# Altium PCB JIG_TEST_FLEX_V1.0.PcbDoc (part 1 of 2)
Units mm, origin at the board's own origin, x right, y up, seen from the top; angles counter-clockwise.
Board outline 55 x 70 mm, 2 copper layers (Top Layer, Bottom Layer); 135 components, 71 nets, 349 pads, 291 vias.
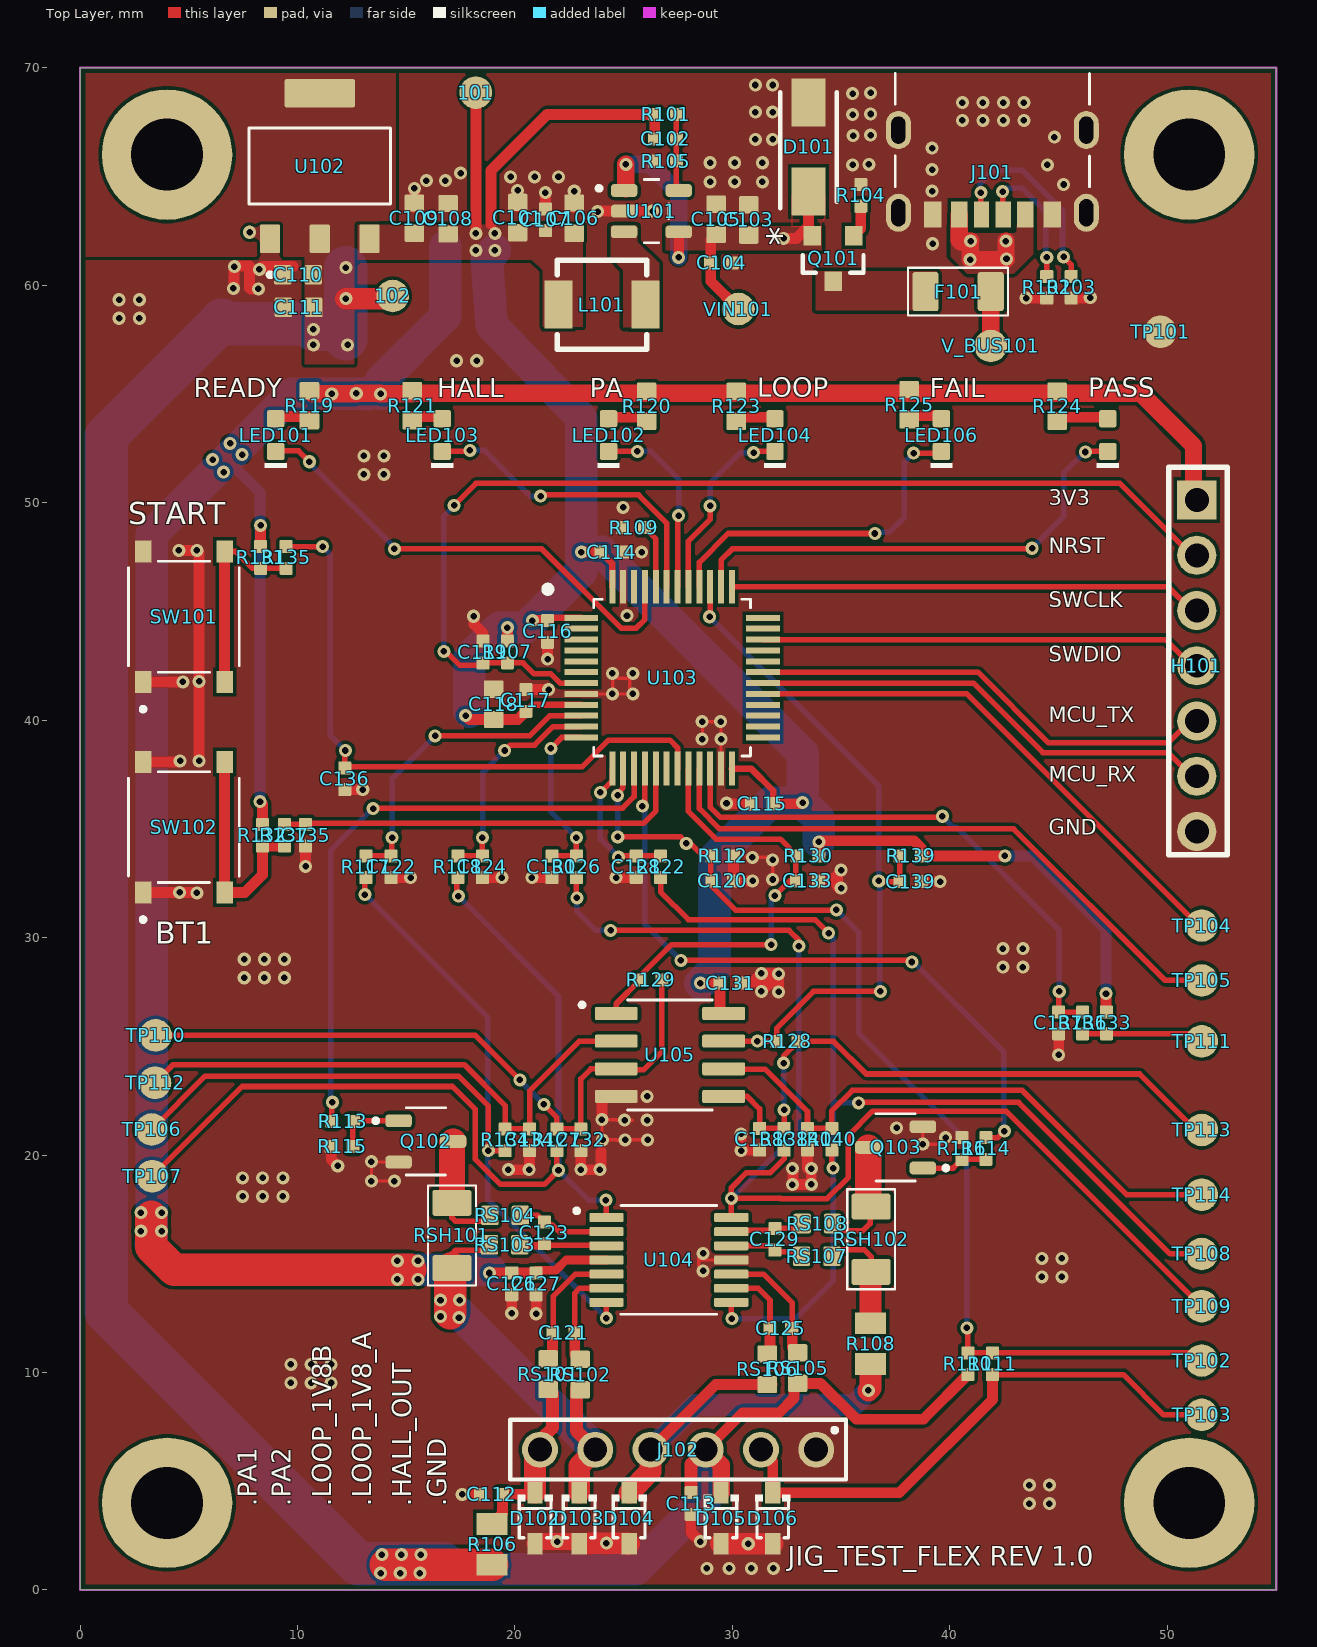
[diagram p0: Top Layer view]
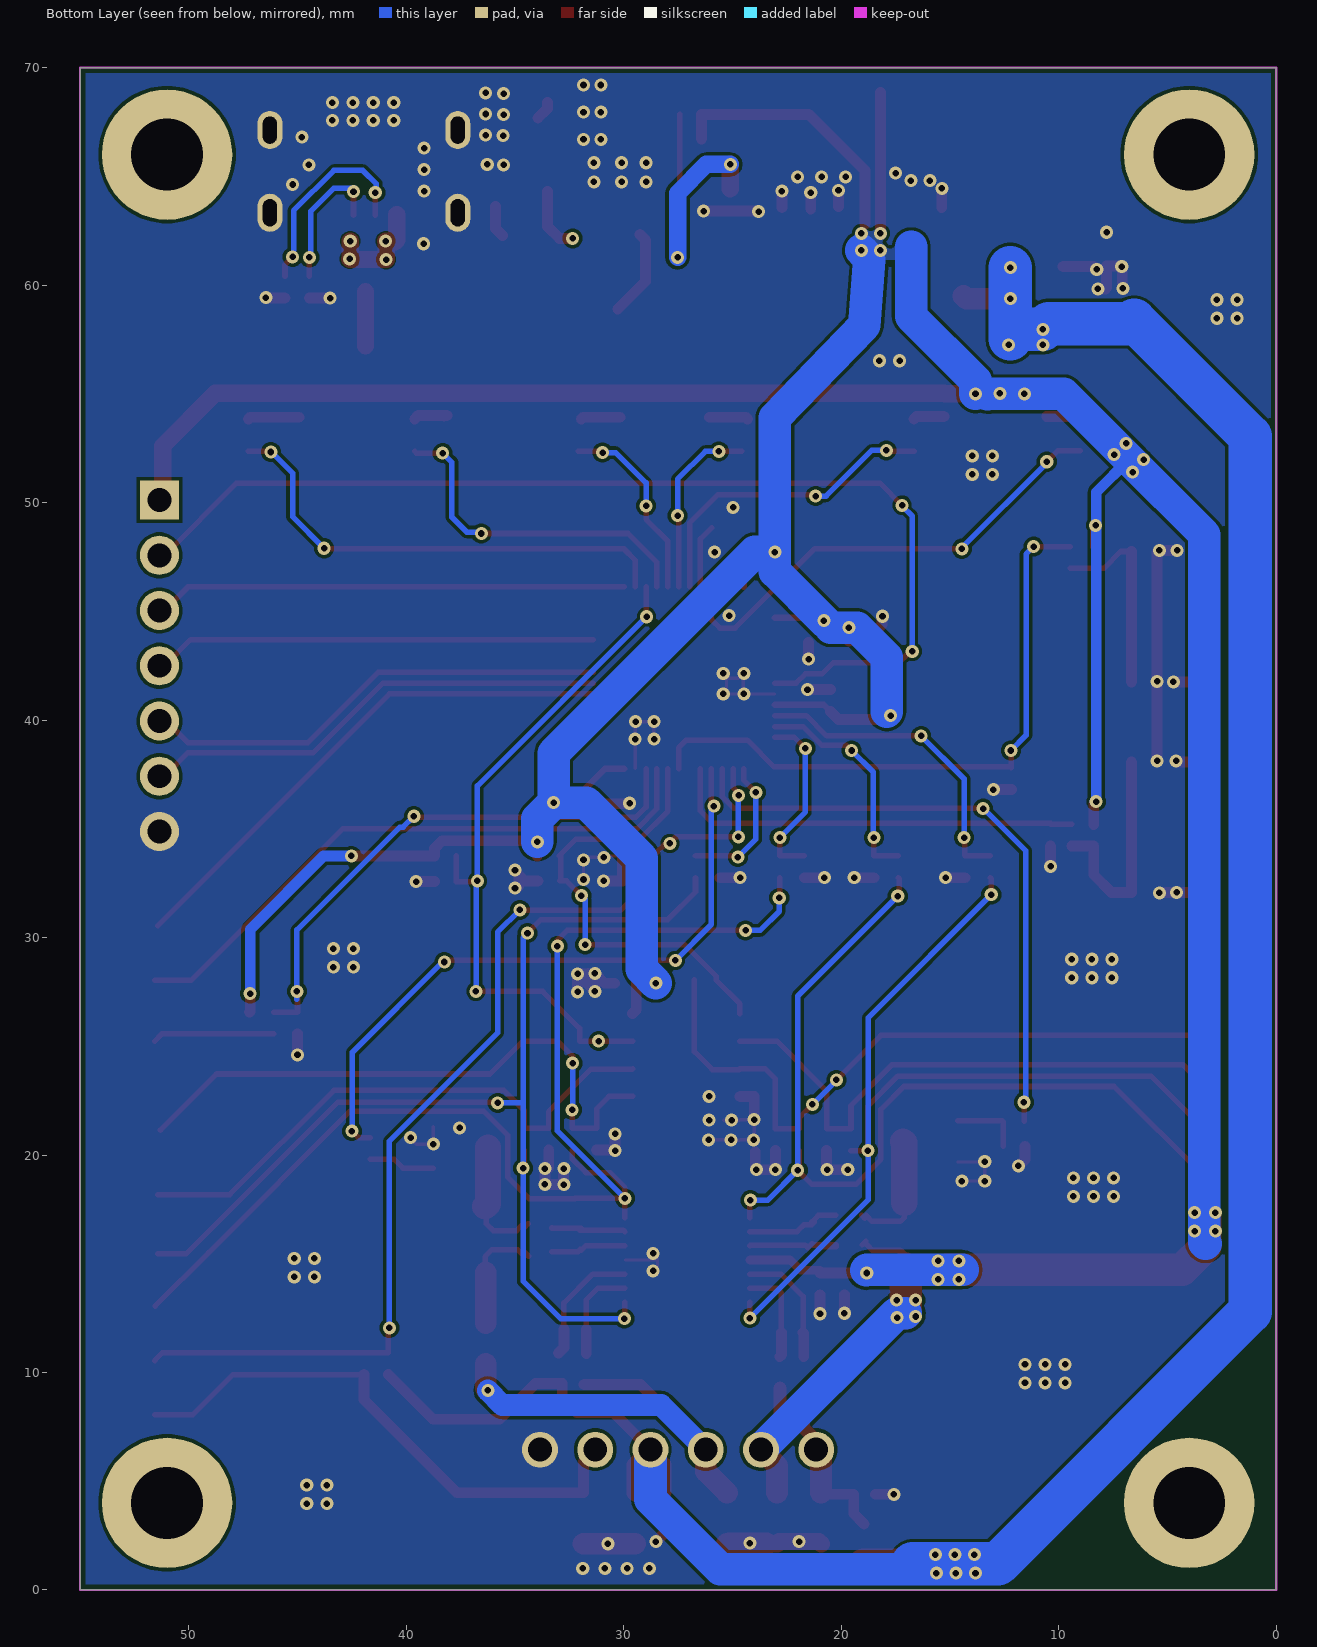
[diagram p1: Bottom Layer view, seen from below]
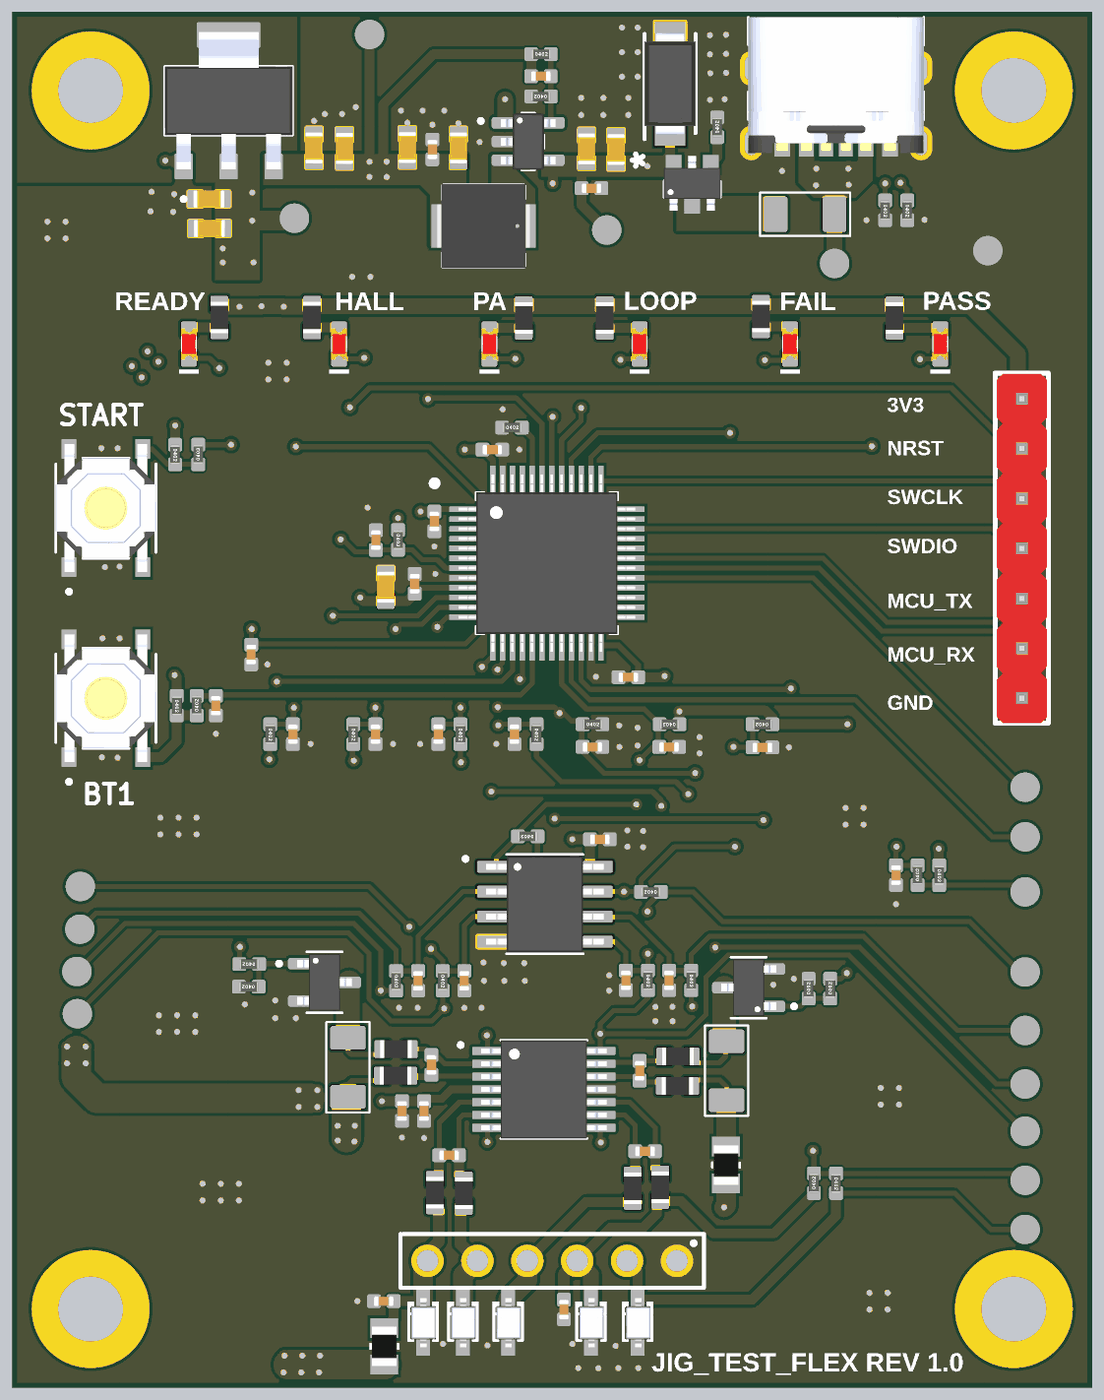
[diagram p3: 3D render of the assembled board from above, using the file's embedded part models]

## Layer stack, top to bottom
Top Solder: solder mask 0.0102, Solder Resist, Dk 3.5
Top Layer: signal copper 0.0356
Dielectric 1: dielectric 0.32, FR-4, Dk 4.8
Bottom Layer: signal copper 0.0356
Bottom Solder: solder mask 0.0102, Solder Resist, Dk 3.5

## Board outline
0,0 0,70 55,70 55,0

## Design rules (kind name [scope] priority, off if disabled: settings)
AssemblyTestPointUsage [All] p1: isadvanced=TRUE
AssemblyTestpoint [All] p1: isadvanced=TRUE testpointundercomponent=TRUE minsize=1.016 maxsize=2.54 preferedsize=1.524 minholesize=0 maxholesize=1.016 preferedholesize=0.813 testpointgrid=0.025 usegrid=TRUE gridoriginx=2.775 gridoriginy=0.075 gridtolerance=0 allowsidetop=TRUE allowsidebottom=TRUE
BoardOutlineClearance [All] p1: isadvanced=TRUE gap=0.2 ignorepadtopadclearanceinfootprint=FALSE
Clearance Clearance_1 [OnMid vs OnMid] p1: gap=0.15 ignorepadtopadclearanceinfootprint=FALSE sourcerule=42 cellrowname=All cellrowtype=0 cellcolname=All cellcoltype=0 innerlayers=TRUE
Clearance Clearance_2 [(ExistsOnLayer('Top Layer') Or ExistsOnLayer('Bottom Layer')) vs (ExistsOnLayer('Top Layer') Or ExistsOnLayer('Bottom Layer'))] p2: gap=0.15 ignorepadtopadclearanceinfootprint=FALSE sourcerule=42 cellrowname=All cellrowtype=0 cellcolname=All cellcoltype=0 outerlayers=TRUE
Clearance [All] p3: gap=0.2 ignorepadtopadclearanceinfootprint=FALSE except(0: Arc-Arc Arc-Track Arc-SMDPad Arc-THPad Arc-Via Arc-Text Arc-Hole Track-Track Track-SMDPad Track-THPad Track-Via Track-Text Track-Hole SMDPad-Via THPad-Via Via-Via) ismatrix=TRUE
ComponentClearance [All] p1: isadvanced=TRUE gap=0.254 collisioncheckmode=3 verticalgap=0.254 showdistances=FALSE
FabricationTestPointUsage [All] p1: isadvanced=TRUE valid=0 allowmultiple=FALSE
FabricationTestpoint [All] p1: isadvanced=TRUE side=3 testpointundercomponent=TRUE minsize=1.016 maxsize=2.54 preferedsize=1.524 minholesize=0 maxholesize=1.016 preferedholesize=0.813 testpointgrid=0.025 allowsidetop=TRUE allowsidebottom=TRUE usegrid=TRUE gridoriginx=2.775 gridoriginy=0.075 gridtolerance=0
FanoutControl Fanout_BGA [IsBGA] p1: isadvanced=TRUE bgadir=Out bgaviamode=Centered fanoutstyle=Auto fanoutdirection=Alternating viagrid=0.025 // Fanout_BGA (Default Rule)
FanoutControl Fanout_LCC [IsLCC] p2: isadvanced=TRUE bgadir=Out bgaviamode=Centered fanoutstyle=Auto fanoutdirection=Alternating viagrid=0.025 // Fanout_LCC (Default Rule)
FanoutControl Fanout_SOIC [IsSOIC] p3: isadvanced=TRUE bgadir=Out bgaviamode=Centered fanoutstyle=Auto fanoutdirection=Alternating viagrid=0.025 // Fanout_SOIC (Default Rule)
FanoutControl Fanout_Small [(CompPinCount < 5)] p4: isadvanced=TRUE bgadir=Out bgaviamode=Centered fanoutstyle=Auto fanoutdirection=OutThenIn viagrid=0.025 // Fanout_Small (Default Rule)
FanoutControl Fanout_Default [All] p5: isadvanced=TRUE bgadir=Out bgaviamode=Centered fanoutstyle=Auto fanoutdirection=Alternating viagrid=0.025 // Fanout_Default (Default Rule)
Height [All] p1: isadvanced=TRUE minheight=0 maxheight=25.4 prefheight=12.7
HoleSize [All] p1: isadvanced=TRUE absolutevalues=TRUE maxlimit=3.5 minlimit=0.025 maxpercent=80.000 minpercent=20.000
HoleToHoleClearance [All] p1: isadvanced=TRUE gap=0.254 allowstackedmicrovias=TRUE
LayerPairs [All] p1: isadvanced=TRUE enforce=TRUE
MinimumSolderMaskSliver [All] p1: isadvanced=TRUE minsoldermaskwidth=0.1
NetAntennae [All] p1: isadvanced=TRUE netantennaetolerance=0
PasteMaskExpansion [All] p1: isadvanced=TRUE expansion=0
PlaneClearance [All] p1: isadvanced=TRUE clearance=0.508
PlaneConnect [All] p1: isadvanced=TRUE planeconnectstyle=Direct reliefexpansion=0.508 reliefentries=4 reliefconductorwidth=0.254 reliefairgap=0.254
PolygonConnect [All] p1: connectstyle=Direct reliefconductorwidth=0.254 reliefentries=4 polygonreliefangle="90 Angle" airgapwidth=0.254
RoutingCorners [All] p1: isadvanced=TRUE cornerstyle=45-Degree minsetback=2.54 maxsetback=2.54
RoutingPriority [All] p1: isadvanced=TRUE routingpriority=0
RoutingVias [All] p1: holewidth=0.3 width=0.6 viastyle="Through Hole" minholewidth=0 minwidth=0 maxholewidth=0.711 maxwidth=1
ShortCircuit [All] p1: isadvanced=TRUE allowed=FALSE
SilkToSilkClearance [All] p1: isadvanced=TRUE silktosilkclearance=0.15
SilkToSolderMaskClearance [IsPad] p1: isadvanced=TRUE minsilkscreentomaskgap=0.15 clearancetoexposedcopper=TRUE
SolderMaskExpansion [All] p1: isadvanced=TRUE expansion=0 istentingtop=FALSE
SupplyNets "Schematic Supply Nets_4" [InNet('3V3')] p1: isadvanced=TRUE voltage=0.000
SupplyNets "Schematic Supply Nets_3" [InNet('V_BUS')] p2: isadvanced=TRUE voltage=0.000
SupplyNets "Schematic Supply Nets_2" [InNet('V_IN')] p3: isadvanced=TRUE voltage=0.000
SupplyNets "Schematic Supply Nets_1" [InNet('LOOP_1V8_A')] p4: isadvanced=TRUE voltage=0.000
SupplyNets "Schematic Supply Nets" [InNet('GND')] p5: isadvanced=TRUE voltage=0.000
UnRoutedNet [All] p1: isadvanced=TRUE
UnpouredPolygon [All] p1: isadvanced=TRUE
Width [All] p1: maxlimit=2 minlimit=0.15 preferedwidth=0.254
4 further rules are at their usual default settings.

## Components (designator, comment, footprint, x,y, rotation, side; value= is the part's Value field where it differs from the comment)
101 "TP_?" TP_SMD_1P50 18.2,68.85 r270 top
102 "TP_?" TP_SMD_1P50 14.375,59.5 r90 top
C101 "10uF" C0603L 20.125,63.1 r90 top
C102 "DNP" C0402L 26.925,66.725 r0 top
C103 "10uF" C0603L 30.75,63 r90 top
C104 "100nF" C0402L 29.5,61.025 r0 top
C105 "4.7uF" C0603L 29.25,63.025 r90 top
C106 "22uF" C0603L 22.725,63.075 r90 top
C107 "100nF" C0402L 21.4,63 r90 top
C108 "10uF" C0603L 16.925,63.05 r90 top
C109 "4.7uF" C0603L 15.375,63.075 r90 top
C110 "4.7uF" C0603L 10.025,60.475 r180 top
C111 "10uF" C0603L 10.05,58.975 r180 top
C112 "100nF" C0402L 18.925,4.4 r180 top
C113 "100nF" C0402L 28.1,3.975 r270 top
C114 "100nF" C0402L 24.45,47.725 r0 top
C115 "100nF" C0402L 31.375,36.15 r180 top
C116 "100nF" C0402L 21.5,44.075 r270 top
C117 "100nF" C0402L 20.5,40.9 r90 top
C118 "4.7uF" C0603L 19.025,40.725 r90 top
C119 "100nF" C0402L 18.525,43.125 r90 top
C120 "1nF" C0402L 29.55,32.6 r0 top
C121 "1nF" C0402L 22.25,11.825 r0 top
C122 "6.8nF" C0402L 14.3,33.25 r270 top
C123 "1nF" C0402L 21.35,16.425 r90 top
C124 "6.8nF" C0402L 18.5,33.25 r270 top
C125 "1nF" C0402L 32.225,12.025 r180 top
C126 "1uF" C0402L 19.85,14.075 r270 top
C127 "100nF" C0402L 20.975,14.075 r270 top
C128 "6.8nF" C0402L 25.575,33.25 r270 top
C129 "1nF" C0402L 31.95,16.125 r90 top
C130 "6.8nF" C0402L 21.7,33.25 r270 top
C131 "100nF" C0402L 29.925,27.9 r0 top
C132 "6.8nF" C0402L 23.025,20.7 r270 top
C133 "1nF" C0402L 33.45,32.6 r0 top
C134 "6.8nF" C0402L 20.675,20.7 r270 top
C135 "100nF" C0402L 10.375,34.7 r270 top
C136 "100nF" C0402L 12.175,37.3 r270 top
C137 "100nF" C0402L 45,26.075 r270 top
C138 "6.8nF" C0402L 31.25,20.725 r270 top
C139 "1nF" C0402L 38.2,32.575 r0 top
C140 "6.8nF" C0402L 33.45,20.725 r270 top
D101 "SMAJ5.0A" DIOM5026X229N 33.5,66.35 r90 top
D102 "PESD5V0U1UA" SOD-323_L1.8-W1.3-LS2.5-RD 20.925,3.3 r270 top
D103 "PESD5V0U1UA" SOD-323_L1.8-W1.3-LS2.5-RD 22.95,3.3 r270 top
D104 "PESD5V0U1UA" SOD-323_L1.8-W1.3-LS2.5-RD 25.25,3.3 r270 top
D105 "PESD5V0U1UA" SOD-323_L1.8-W1.3-LS2.5-RD 29.475,3.3 r270 top
D106 "PESD5V0U1UA" SOD-323_L1.8-W1.3-LS2.5-RD 31.85,3.3 r270 top
F101 "PTC 500mA 6V" R1206Z 40.375,59.7 r180 top
H101 "HEADER DEBUG" HDR_1X07_P2.54_D1.10 51.35,50.115 r270 top
J101 "10164359-00011LF" AMPHENOL_10164359-00011LF 41.95,66.275 r180 top
J102 "Header 6P" 61300611121 27.5,6.45 r180 top
L101 "2.2uH" IND-SMD_L4.1-W4.1_PSPMAA0402-1 24,59.1 r180 top
LED101 "READY" LED0603_RED 9,53.1 r270 top
LED102 "PA" LED0603_RED 24.303,53.1 r270 top
LED103 "HALL" LED0603_RED 16.652,53.1 r270 top
LED104 "LOOP" LED0603_RED 31.955,53.1 r270 top
LED106 "FAIL" LED0603_RED 39.607,53.1 r270 top
PASS "PASS" LED0603_RED 47.259,53.1 r270 top (schematic designator LED105)
Q101 "AO3401A" SOT23-3 34.625,61.275 r90 top
Q102 "AO3400A" SOT95P280X125-3N 15.905,20.625 r0 top
Q103 "AO3400A" SOT95P280X125-3N 37.5,20.35 r180 top
R101 "100K" R0402L1 26.925,67.85 r0 top
R102 "5.1K" R0402L1 44.45,59.9 r270 top
R103 "5.1K" R0402L1 45.575,59.9 r270 top
R104 "5.1K" R0402L1 35.9,64.125 r90 top
R105 "22K" R0402L1 26.925,65.7 r180 top
R106 "20R" R0805 18.95,2.1 r90 top
R107 "10K" R0402L1 19.65,43.132 r270 top
R108 "20R" R0805 36.35,11.325 r270 top
R109 "10K" R0402L1 25.45,48.85 r0 top
R110 "100K" R0402L1 40.825,10.4 r90 top
R111 "1K" R0402L1 41.95,10.4 r270 top
R112 "100K" R0402L1 29.55,33.75 r0 top
R113 "4.7K" R0402L1 12.075,21.55 r180 top
R114 "4.7K" R0402L1 41.65,20.3 r90 top
R115 "100K" R0402L1 12.05,20.4 r180 top
R116 "100K" R0402L1 40.55,20.3 r90 top
R117 "470R" R0402L1 13.146,33.25 r270 top
R118 "470R" R0402L1 17.375,33.25 r270 top
R119 "680R" R0603L 10.55,54.45 r270 top
R120 "680R" R0603L 26.05,54.425 r270 top
R121 "680R" R0603L 15.275,54.45 r270 top
R122 "470R" R0402L1 26.7,33.25 r270 top
R123 "680R" R0603L 30.175,54.425 r270 top
R124 "680R" R0603L 44.925,54.425 r270 top
R125 "680R" R0603L 38.125,54.5 r270 top
R126 "470R" R0402L1 22.825,33.25 r270 top
R127 "470R" R0402L1 21.925,20.7 r270 top
R128 "DNP" R0402L1 32.525,25.225 r180 top
R129 "DNP" R0402L1 26.25,28.05 r180 top
R130 "4.7K" R0402L1 33.475,33.75 r180 top
R131 "10K" R0402L1 8.3,47.475 r270 top
R132 "10K" R0402L1 8.388,34.7 r270 top
R133 "10K" R0402L1 47.2,26.075 r270 top
R134 "470R" R0402L1 19.55,20.7 r270 top
R135 "1K" R0402L1 9.475,47.475 r90 top
R136 "1K" R0402L1 46.1,26.075 r90 top
R137 "1K" R0402L1 9.4,34.7 r90 top
R138 "470R" R0402L1 32.375,20.725 r270 top
R139 "4.7K" R0402L1 38.2,33.75 r180 top
R140 "470R" R0402L1 34.575,20.725 r270 top
RS101 "4.7R" R0603L 21.525,9.925 r270 top
RS102 "4.7R" R0603L 23,9.9 r270 top
RS103 "4.7R" R0603L 19.525,15.875 r180 top
RS104 "4.7R" R0603L 19.546,17.221 r180 top
RS105 "4.7R" R0603L 33,10.2 r270 top
RS106 "4.7R" R0603L 31.6,10.15 r270 top
RS107 "4.7R" R0603L 33.875,15.35 r0 top
RS108 "4.7R" R0603L 33.9,16.85 r0 top
RSH101 "1R" R1206Z 17.1,16.3 r270 top
RSH102 "1R" R1206Z 36.375,16.125 r270 top
SW101 "TS-1187A-B-A-B" SW_TS-1187A-B-A-B 4.775,44.75 r90 top
SW102 "TS-1187A-B-A-B" SW_TS-1187A-B-A-B 4.775,35.075 r90 top
TP101 "TP_?" TP_SMD_1P50 49.675,57.85 r0 top
TP102 "" TP_SMD_1P50 51.575,10.55 r90 top
TP103 "" TP_SMD_1P50 51.575,8.05 r90 top
TP104 "TP_PA8" TP_SMD_1P50 51.575,30.55 r90 top
TP105 "TP_PA8" TP_SMD_1P50 51.575,28.025 r90 top
TP106 "" TP_SMD_1P50 3.3,21.175 r90 top
TP107 "" TP_SMD_1P50 3.325,19.025 r90 top
TP108 "" TP_SMD_1P50 51.575,15.45 r90 top
TP109 "" TP_SMD_1P50 51.575,13.05 r90 top
TP110 "" TP_SMD_1P50 3.475,25.5 r90 top
TP111 "TP_SW3" TP_SMD_1P50 51.575,25.225 r90 top
TP112 "" TP_SMD_1P50 3.45,23.325 r90 top
TP113 "" TP_SMD_1P50 51.575,21.15 r90 top
TP114 "" TP_SMD_1P50 51.575,18.175 r90 top
U101 "TLV62569DBVR" SOT95P280X145-5N 26.275,63.4 r0 top
U102 "AMS1117-1.8" SOT229P700X180-4N 11.025,65.475 r90 top
U103 "STM32F030C8T6" QFP50P900X900X160-48N 27.225,41.95 r0 top
U104 "INA4180A1IPWR" SOP65P640X120-14N 27.075,15.175 r0 top
U105 "LMV393IDR" SOIC127P599X175-8N 27.125,24.6 r0 top
V_BUS101 "TP_?" TP_SMD_1P50 41.875,57.2 r270 top
VIN101 "TP_?" TP_SMD_1P50 30.275,58.9 r180 top

## Footprints (in the part's own frame and the unit in brackets; to place one, negate y for a bottom-side part, rotate by r counter-clockwise, add the part's x,y. Pads: shape width x height; smd on the part's side, far side on the other; paste and mask are expansions set on the pad)
61300611121 [mm]
  round 1.65 hole 1.1: 1(-6.35,0) 2(-3.81,0) 3(-1.27,0) 4(1.27,0) 5(3.81,0) 6(6.35,0)
  silkscreen extent -7.72,-1.37 7.72,1.37
AMPHENOL_10164359-00011LF [mm]
  rect 0.7x1.2 smd: A5(-0.5,3.03) B5(0.5,3.03)
  rect 0.76x1.2 smd: A9(1.52,3.03) B9(-1.52,3.03)
  rect 0.8x1.2 smd: A12(2.75,3.03) B12(-2.75,3.03)
  oval 1.15x1.75 hole 0.65 slot 1.25 at 90 deg: SH1(-4.32,2.95) SH2(4.32,2.95) SH3(-4.32,-0.85) SH4(4.32,-0.85)
  silkscreen extent -4.47,-3.45 4.47,1.76, body extent -4.47,-3.45 4.47,3.45, height 3.26
C0402L [mm]
  rrect20% 0.6x0.6 smd paste+0.05 mask+0.05: 1(-0.5,0) 2(0.5,0)
  body extent -0.5,-0.25 0.5,0.25, height 0.49
C0603L [mm]
  rrect20% 0.8x0.9 smd mask+0.05: 1(-0.7,0) 2(0.7,0)
  body extent -0.8,-0.45 0.8,0.45, height 0.8
DIOM5026X229N [mm]
  rect 2.2x1.55 smd paste+0 mask+0.102: 1(-2.05,0) 2(2.05,0)
  silkscreen extent -2.83,-1.3 2.52,1.3, body extent -2.61,-1.3 2.61,1.3, height 2.4
HDR_1X07_P2.54_D1.10 [mm]
  rect 1.8x1.8 hole 1.1: 1(0,0)
  round 1.8 hole 1.1: 2(2.54,0) 3(5.08,0) 4(7.62,0) 5(10.16,0) 6(12.7,0) 7(15.24,0)
  silkscreen extent -1.5,-1.3 16.3,1.4, body extent -1.47,-1.21 16.31,1.33, height 10.62
IND-SMD_L4.1-W4.1_PSPMAA0402-1 [mm]
  rect 1.3x2.2 smd: 1(-1.999,0) 2(2.002,0)
  silkscreen extent -2.05,-2.05 2.05,2.05, body extent -2.35,-2.16 2.35,2.16, height 2.01
LED0603_RED [mm]
  rrect25% 0.8x0.8 smd mask+0.05: 1(-0.75,0) 2(0.75,0)
  silkscreen extent 1.3,-0.5 1.5,0.5, body extent -0.8,-0.4 0.8,0.4, height 0.6
QFP50P900X900X160-48N [mm]
  rect 1.56x0.28 smd: 1(-4.18,2.75) 2(-4.18,2.25) 3(-4.18,1.75) 4(-4.18,1.25) 5(-4.18,0.75) 6(-4.18,0.25) 7(-4.18,-0.25) 8(-4.18,-0.75) 9(-4.18,-1.25) 10(-4.18,-1.75) 11(-4.18,-2.25) 12(-4.18,-2.75) 25(4.18,-2.75) 26(4.18,-2.25) 27(4.18,-1.75) 28(4.18,-1.25) 29(4.18,-0.75) 30(4.18,-0.25) 31(4.18,0.25) 32(4.18,0.75) 33(4.18,1.25) 34(4.18,1.75) 35(4.18,2.25) 36(4.18,2.75)
  rect 0.28x1.56 smd: 13(-2.75,-4.18) 14(-2.25,-4.18) 15(-1.75,-4.18) 16(-1.25,-4.18) 17(-0.75,-4.18) 18(-0.25,-4.18) 19(0.25,-4.18) 20(0.75,-4.18) 21(1.25,-4.18) 22(1.75,-4.18) 23(2.25,-4.18) 24(2.75,-4.18) 37(2.75,4.18) 38(2.25,4.18) 39(1.75,4.18) 40(1.25,4.18) 41(0.75,4.18) 42(0.25,4.18) 43(-0.25,4.18) 44(-0.75,4.18) 45(-1.25,4.18) 46(-1.75,4.18) 47(-2.25,4.18) 48(-2.75,4.18)
  silkscreen extent -5.86,-3.6 3.6,4.21, body extent -4.5,-4.5 4.5,4.5, height 1.6
R0402L1 [mm]
  rrect20% 0.6x0.6 smd paste+0.05 mask+0.05: 1(-0.5,0) 2(0.5,0)
  body extent -0.5,-0.25 0.52,0.25, height 0.51
R0603L [mm]
  rrect20% 0.8x0.9 smd mask+0.05: 1(-0.7,0) 2(0.7,0)
  body extent -0.8,-0.45 0.8,0.45, height 0.8
R0805 [mm]
  rect 1x1.42 smd: 1(-0.935,0) 2(0.935,0)
  silkscreen extent -0.12,-0.7 0.12,0.7, body extent -1,-0.63 1,0.63, height 0.6
R1206Z [mm]
  rrect20% 1.2x1.8 smd paste+0 mask+0.05: 1(-1.5,0) 2(1.5,0)
  silkscreen extent -2.3,-1.1 2.3,1.1, body extent -1.7,-0.9 1.7,0.9, height 1.35
SOD-323_L1.8-W1.3-LS2.5-RD [mm]
  rect 1.001x0.701 smd: 1(-1.171,0) 2(1.173,0)
  silkscreen extent -1.08,-0.8 0.9,0.8, body extent -1.24,-0.6 1.24,0.65, height 0.95
SOIC127P599X175-8N [mm]
  rrect25% 1.97x0.6 smd paste+0 mask+0.102: 1(-2.47,1.905) 2(-2.47,0.635) 3(-2.47,-0.635) 4(-2.47,-1.905) 5(2.47,-1.905) 6(2.47,-0.635) 7(2.47,0.635) 8(2.47,1.905)
  silkscreen extent -4.14,-2.52 1.95,2.52, body extent -3,-2.45 3,2.45, height 1.75
SOP65P640X120-14N [mm]
  rrect25% 1.57x0.41 smd: 1(-2.87,1.95) 2(-2.87,1.3) 3(-2.87,0.65) 4(-2.87,0) 5(-2.87,-0.65) 6(-2.87,-1.3) 7(-2.87,-1.95) 8(2.87,-1.95) 9(2.87,-1.3) 10(2.87,-0.65) 11(2.87,0) 12(2.87,0.65) 13(2.87,1.3) 14(2.87,1.95)
  silkscreen extent -4.34,-2.5 2.2,2.5, body extent -3.2,-2.5 3.2,2.5, height 1.2
SOT23-3 [mm]
  rect 0.9x0.8 smd: 1(1,-0.95) 2(1,0.95) 3(-1.1,0)
  silkscreen extent -0.7,-1.4 0.1,1.4, body extent -1.4,-1.45 1.4,1.45, height 1.25
SOT95P280X125-3N [mm]
  rrect50% 1.21x0.59 smd: 1(-1.255,0.95) 2(-1.255,-0.95) 3(1.255,0)
  silkscreen extent -2.41,-1.55 0.9,1.55, body extent -1.4,-1.45 1.4,1.45, height 1.25
SOT95P280X145-5N [mm]
  rrect50% 1.21x0.59 smd: 1(-1.255,0.95) 2(-1.255,0) 3(-1.255,-0.95) 4(1.255,-0.95) 5(1.255,0.95)
  silkscreen extent -2.51,-1.45 0.8,1.45, body extent -1.4,-1.45 1.4,1.45, height 1.45
SOT229P700X180-4N [mm]
  rrect15% 1.31x0.93 smd: 1(-3.345,2.29) 2(-3.345,0) 3(-3.345,-2.29)
  rrect15% 1.31x3.24 smd: 4(3.345,0)
  silkscreen extent -5.1,-3.25 1.75,3.25, body extent -3.5,-3.25 3.5,3.25, height 1.8
SW_TS-1187A-B-A-B [mm]
  rect 1x0.75 smd: A(-3,1.875) B(3,1.875) C(-3,-1.875) D(3,-1.875)
  silkscreen extent -4.35,-2.55 2.55,2.55, body extent -3.25,-2.55 3.25,2.55, height 1.55
TP_SMD_1P50 [mm] "Single 1.50 mm round top-layer copper test point for probing"
  round 1.5 smd: 1(0,0)

## Part data
101 102 TP101 TP102 TP103 TP104 TP105 TP106 TP107 TP108 TP109 TP110 TP111 TP112 TP113 TP114 V_BUS101 VIN101: library part TEST_POINT, "TP SMD 1P PadDia_1.50mm ROUND COPPER TEST POINT"
C101 C103 C108 C111: library part C0402, "CAP 0402 MLCC NON-POLARIZED GENERIC; VALUE TOLERANCE VOLTAGE AND MPN SET ON INSTANCE", Case=0603, JLCPCB Part #=C19702, Manufacturer="Samsung Electro-Mechanics", MPN=CL10A106KP8NNNC, Tolerance=10%, Value2=10V, LCSC Part #=C19702, Manu="Samsung Electro-Mechanics", Type=Capacitor, Value1=10uF
C102: library part C0402, "CAP 0402 MLCC NON-POLARIZED GENERIC; VALUE TOLERANCE VOLTAGE AND MPN SET ON INSTANCE", Case=0402, JLCPCB Part #=C22367823, Manufacturer=Chinocera, MPN=HGC0402R5226M100NTEJ, Tolerance=20%, Value1=22uF, Value2=10V, LCSC Part #=C22367823, Manu=Chinocera, Type=Capacitor
C104 C107: library part C0402, "CAP 0402 MLCC NON-POLARIZED GENERIC; VALUE TOLERANCE VOLTAGE AND MPN SET ON INSTANCE", Case=0402, JLCPCB Part #=C307331, Manufacturer="Samsung Electro-Mechanics", MPN=CL05B104KB54PNC, Tolerance=10%, Value2=50V, LCSC Part #=C307331, Manu="Samsung Electro-Mechanics", Type=Capacitor, Value1=100nF
C105 C109 C110: library part C0402, "CAP 0402 MLCC NON-POLARIZED GENERIC; VALUE TOLERANCE VOLTAGE AND MPN SET ON INSTANCE", Case=0603, JLCPCB Part #=C19666, Manufacturer="Samsung Electro-Mechanics", MPN=CL10A475KO8NNNC, Tolerance=10%, Value2=16V, LCSC Part #=C19666, Manu="Samsung Electro-Mechanics", Type=Capacitor, Value1=4.7uF
C106: library part C0402, "CAP 0402 MLCC NON-POLARIZED GENERIC; VALUE TOLERANCE VOLTAGE AND MPN SET ON INSTANCE", Case=0603, JLCPCB Part #=C59461, Manufacturer="Samsung Electro-Mechanics", MPN=CL10A226MQ8NRNC, Tolerance=20%, Value2=6.3V, LCSC Part #=C59461, Manu="Samsung Electro-Mechanics", Type=Capacitor, Value1=22uF
C112 C113 C114 C115 C116 C117 C119 C127 C131 C135 C136 C137: library part C0402, "CAP 0402 MLCC NON-POLARIZED GENERIC; VALUE TOLERANCE VOLTAGE AND MPN SET ON INSTANCE", Case=0402, Dielectric=X7R, JLCPCB Part #=C1525, Manufacturer="Samsung Electro-Mechanics", Manufacturer Part Number=CL05B104KO5NNNC, Tolerance=10%, Value2=16V, LCSC Part #=C1525, Manu="Samsung Electro-Mechanics", MPN=CL05B104KO5NNNC, Package=0402, Type=Capacitor, Value1=100nF, Voltage Rating=16V
C118: library part C0402, "CAP 0402 MLCC NON-POLARIZED GENERIC; VALUE TOLERANCE VOLTAGE AND MPN SET ON INSTANCE", Case=0603, Dielectric=X5R, JLCPCB Part #=C19666, Manufacturer="Samsung Electro-Mechanics", Manufacturer Part Number=CL10A475KO8NNNC, Tolerance=10%, Value2=16V, LCSC Part #=C19666, Manu="Samsung Electro-Mechanics", MPN=CL10A475KO8NNNC, Package=0603, Type=Capacitor, Value1=4.7uF, Voltage Rating=16V
C120 C121 C123 C125 C129 C133 C139: library part C0402, "CAP 0402 MLCC NON-POLARIZED GENERIC; VALUE TOLERANCE VOLTAGE AND MPN SET ON INSTANCE", Case=0402, Dielectric=C0G, JLCPCB Part #=C53547, Manufacturer=FH, Manufacturer Part Number=0402CG102J500NT, Tolerance=5%, Value2=50V, LCSC Part #=C53547, Manu=FH, MPN=0402CG102J500NT, Package=0402, Type=Capacitor, Value1=1nF, Voltage Rating=50V
C122 C124 C128 C130 C132 C134 C138 C140: library part C0402, "CAP 0402 MLCC NON-POLARIZED GENERIC; VALUE TOLERANCE VOLTAGE AND MPN SET ON INSTANCE", Case=0402, Dielectric=X7R, JLCPCB Part #=C1542, Manufacturer="FH (Guangdong Fenghua Advanced Tech)", Manufacturer Part Number=0402B682K500NT, Tolerance=10%, Value2=50V, LCSC Part #=C1542, Manu="FH (Guangdong Fenghua Advanced Tech)", MPN=0402B682K500NT, Package=0402, Type=Capacitor, Value1=6.8nF, Voltage Rating=50V
C126: library part C0402, "CAP 0402 MLCC NON-POLARIZED GENERIC; VALUE TOLERANCE VOLTAGE AND MPN SET ON INSTANCE", Case=0402, Dielectric=X5R, JLCPCB Part #=C52923, Manufacturer="Samsung Electro-Mechanics", Manufacturer Part Number=CL05A105KA5NQNC, Tolerance=10%, Value2=25V, LCSC Part #=C52923, Manu="Samsung Electro-Mechanics", MPN=CL05A105KA5NQNC, Package=0402, Type=Capacitor, Value1=1uF, Voltage Rating=25V
D101: "TVS SMA/DO-214AC Vrwm_5V Ppk_400W@10/1000us UNIDIRECTIONAL SMAJ5.0A", Case=DO-214AC, JLCPCB Part #=C2925443, Value1="Vrwm 5V", Value2="Ppp 400W, 10/1000us", Check_prices=https://jlcpcb.com/partdetail/Liown-SMAJ50A/C2925443, Manu=Liown, MF=Liown, MP=SMAJ5.0A, MPN=SMAJ5.0A, Package=DO-214AC, SnapEDA_Link=https://www.snapeda.com/parts/SMAJ5.0A/Bourns/view-part/?ref=snap, Type=TVS
D102 D103 D104 D105 D106: "TVS SOD-323 ESD PROTECTION PESD5V0U1UA", Case=SOD-323, Clamping Voltage=10V；14V, JLCPCB Part #=C19829579, JLCPCB Part Class="Extended Part", Junction Capacitance=0.5pF, LCSC Part Name="5V截止 峰值浪涌电流：4A@8/20us", Manufacturer="TECH PUBLIC", Peak Pulse Current (Ipp)=4A@8/20us, Peak Pulse Power Dissipation (Ppp)=65W@8/20us, Reverse Leakage Current (Ir)=80nA, Reverse Stand-Off Voltage (Vrwm)=5V, Value1="Vrwm 5V", Value2="Ipp 4A, 8/20us", Voltage - Breakdown=7.5V, AddInBom=yes, ConvertToPcb=yes, Datasheet=https://www.lcsc.com/datasheet/C19829579.pdf, Device=PESD5V0U1UA, FootprintName=SOD-323_L1.8-W1.3-LS2.5-RD, level of protection="IEC 61000-4-5；IEC 61000-4-2", Manu="TECH PUBLIC", ManufacturerPart=PESD5V0U1UA, ModelId=533ebfb2f206414f9035ed0ccba1097dÂŽ0819f05c4eef4c71ace90d822a990e87, ModelName=SOD-323_L1.8-W1.3-LS2.5-RD, ModelTransform=104.3305,51.181,0,0,0,0,0,-0.004,0, MPN=PESD5V0U1UA, Supplier=LCSC, Supplier Footprint=SOD-323, SupplierPart=C19829579, Symbol=PESD5V0U1UA_C19829579, Type=TVS
F101: library part nSMD050, "FUSE 1206 PTC RESETTABLE nSMD050", Case=1206, JLCPCB Part #=C69688, Manufacturer=TECHFUSE, Value1=500mA, Value2=6V, LCSC Part #=C69688, Manu=TECHFUSE, Manufacturer Part Number=nSMD050, MPN=nSMD050, Package=1206, Type=Fuse
H101: library part "Header 7P 2.54 Duc Thang", "CON THT 7P Pitch_2.54mm SINGLE-ROW; MPN UNVERIFIED", Case=THT-1x7-P2.54mm, Value1="Male Header 1x7", Value2="Pitch 2.54mm", Chung_Loai=Cắm, Don_Vi=Con, Ma_Hang=MH003369, Ten_Linh_Kien="Header 7P XH2.54-7P Đực Thẳng", Type=Connector
J101: "CON SMD 6P USB TYPE-C RECEPTACLE SINGLE-ROW 10164359-00011LF", Case=USB-C-6P-SMD, JLCPCB Part #=C5407555, Manufacturer="Amphenol ICC", Value1="USB Type-C 6P", Value2=3A, Check_prices=https://www.snapeda.com/parts/1016435900011LF/Amphenol/view-part/?ref=eda, LCSC Part #=C5407555, Manu="Amphenol ICC", Manufacturer Part Number=10164359-00011LF, MF="Amphenol ICC", MP=10164359-00011LF, MPN=10164359-00011LF, Package=USB-C-6P-SMD, SnapEDA_Link=https://www.snapeda.com/parts/1016435900011LF/Amphenol/view-part/?ref=snap, Type=Connector
J102: library part 6130XX11121_61300611121, "CON THT 6P 3A 250VAC Pitch_2.54mm SINGLE-ROW PIN HEADER", Case=THT-1x6-P2.54mm, MPN=61300611121, Value1="Male Header 1x6", Value2="Pitch 2.54mm", Availability="Check JLC stock at order", Manu="Wurth Elektronik", MF="Wurth Elektronik", MP=61300611121, Package=THT-1x6-P2.54mm, Price=None, Type=Connector
L101: library part PSPMAA0402-2R2M-ANP, "IND SMD 2.2uH +/-20% Irms_3A Isat_5A DCRmax_58mOhm MOLDED POWER", Case="SMD 4.5x4.1mm", Current - Saturation(Isat)=5A, Current Rating=3A, DC Resistance(DCR)="58 mOhm max", JLCPCB Part #=C436515, JLCPCB Part Class="Extended Part", LCSC Part Name="2.2uH +/-20%, 3A Irms, 5A Isat", Manufacturer="PROD Tech", Tolerance=±20%, Value2="Irated 3A, Isat 5A", AddInBom=yes, ConvertToPcb=yes, Datasheet=https://static.chipdip.ru/lib/612/DOC042612369.pdf, Device=PSPMAA0402-2R2M-ANP, FootprintName=IND-SMD_L4.1-W4.1_PSPMAA0402-1, Manu="PROD Tech", ManufacturerPart=PSPMAA0402-2R2M-ANP, MPN=PSPMAA0402-2R2M-ANP, Supplier=LCSC, Supplier Footprint=SMD,4.5x4.1mm, SupplierPart=C436515, Symbol=PSPMAA0402-2R2M-ANP, Type=Inductor, Value1=2.2uH
LED101 LED102 LED103 LED104 LED106 PASS: library part "LED RED 0603", "LED 0603; COLOR AND MPN UNRESOLVED", Case=0603, JLCPCB Part #=C2286, Manufacturer="Hubei KENTO Elec", Manufacturer Part Number=KT-0603R, Value1="LED RED", Value2=5mA, LCSC Part #=C2286, Manu="Hubei KENTO Elec", MPN=KT-0603R, Package=0603, Type=LED
  LED101: Comment Description="READY LED RED 0603"
  LED102: Comment Description="PA LED RED 0603"
  LED103: Comment Description="HALL LED RED 0603"
  LED104: Comment Description="LOOP LED RED 0603"
  LED106: Comment Description="FAIL LED RED 0603"
  PASS: Comment Description="PASS LED RED 0603"
Q101: "P-MOS SOT-23 Vds_-30V IdMax_-4A@TA25C AO3401A", Case=SOT-23, JLCPCB Part #=C15127, Manufacturer="Alpha & Omega Semicon", Value1=P-Channel, Value2="Vds -30V", Check_prices=https://www.snapeda.com/parts/AO3401A/Alpha/view-part/?ref=eda, LCSC Part #=C15127, Manu="Alpha & Omega Semicon", Manufacturer Part Number=AO3401A, MF="Alpha & Omega Semicon", MP=AO3401A, MPN=AO3401A, Package=SOT-23, SnapEDA_Link=https://www.snapeda.com/parts/AO3401A/Alpha/view-part/?ref=snap, Type=MOSFET
Q102 Q103: "N-MOS SOT-23 Vds_30V IdMax_5.7A@TA25C AO3400A", Case=SOT-23, JLCPCB Part #=C20917, Manufacturer="Alpha & Omega Semicon", Value1=N-Channel, Value2="Vds 30V", Check_prices=https://www.snapeda.com/parts/AO3400A/Alpha/view-part/?ref=eda, LCSC Part #=C20917, Manu="Alpha & Omega Semicon", Manufacturer Part Number=AO3400A, MF="Alpha & Omega Semicon", MP=AO3400A, MPN=AO3400A, Package=SOT-23, SnapEDA_Link=https://www.snapeda.com/parts/AO3400A/Alpha/view-part/?ref=snap, Type=MOSFET
R101 R110 R112 R115 R116: library part R0402_4, "RES 0402 GENERIC; VALUE TOLERANCE POWER AND MPN SET ON INSTANCE", Case=0402, JLCPCB Part #=C25741, Manufacturer="UNI-ROYAL(Uniroyal Elec)", Manufacturer Part Number=0402WGF1003TCE, Tolerance=1%, Value2=62.5mW, Comment Description="RES 100K +/-1% 62.5mW 0402", LCSC Part #=C25741, Manu="UNI-ROYAL(Uniroyal Elec)", MPN=0402WGF1003TCE, Package=0402, Type=Resistor, Value1=100K
R102 R103 R104: library part R0402_4, "RES 0402 GENERIC; VALUE TOLERANCE POWER AND MPN SET ON INSTANCE", Case=0402, JLCPCB Part #=C25905, Manufacturer="UNI-ROYAL(Uniroyal Elec)", Manufacturer Part Number=0402WGF5101TCE, Tolerance=1%, Value2=62.5mW, Comment Description="RES 5.1K +/-1% 62.5mW 0402", LCSC Part #=C25905, Manu="UNI-ROYAL(Uniroyal Elec)", MPN=0402WGF5101TCE, Package=0402, Type=Resistor, Value1=5.1K
R105: library part R0402_4, "RES 0402 GENERIC; VALUE TOLERANCE POWER AND MPN SET ON INSTANCE", Case=0402, JLCPCB Part #=C25768, Manufacturer="UNI-ROYAL(Uniroyal Elec)", Manufacturer Part Number=0402WGF2202TCE, Tolerance=1%, Value2=62.5mW, Comment Description="RES 22K +/-1% 62.5mW 0402", LCSC Part #=C25768, Manu="UNI-ROYAL(Uniroyal Elec)", MPN=0402WGF2202TCE, Package=0402, Type=Resistor, Value1=22K
R106 R108: library part R0805, "RES 0805 GENERIC; VALUE TOLERANCE POWER AND MPN SET ON INSTANCE", Case=0805, JLCPCB Part #=C313859, Manufacturer="Vishay Intertech", Manufacturer Part Number=CRCW080520R0FKEAHP, Tolerance=1%, Value2=500mW, Comment Description="RES 20R +/-1% 500mW 0805", LCSC Part #=C313859, Manu="Vishay Intertech", MPN=CRCW080520R0FKEAHP, Package=0805, Type=Resistor, Value1=20R
R107 R109 R131 R132 R133: library part R0402_4, "RES 0402 GENERIC; VALUE TOLERANCE POWER AND MPN SET ON INSTANCE", Case=0402, JLCPCB Part #=C25744, Manufacturer="UNI-ROYAL(Uniroyal Elec)", Manufacturer Part Number=0402WGF1002TCE, Tolerance=1%, Value2=62.5mW, Comment Description="RES 10K +/-1% 62.5mW 0402", LCSC Part #=C25744, Manu="UNI-ROYAL(Uniroyal Elec)", MPN=0402WGF1002TCE, Package=0402, Type=Resistor, Value1=10K
R111 R135 R136 R137: library part R0402_4, "RES 0402 GENERIC; VALUE TOLERANCE POWER AND MPN SET ON INSTANCE", Case=0402, JLCPCB Part #=C11702, Manufacturer="UNI-ROYAL(Uniroyal Elec)", Manufacturer Part Number=0402WGF1001TCE, Tolerance=1%, Value2=62.5mW, Comment Description="RES 1K +/-1% 62.5mW 0402", LCSC Part #=C11702, Manu="UNI-ROYAL(Uniroyal Elec)", MPN=0402WGF1001TCE, Package=0402, Type=Resistor, Value1=1K
R113 R114 R130 R139: library part R0402_4, "RES 0402 GENERIC; VALUE TOLERANCE POWER AND MPN SET ON INSTANCE", Case=0402, JLCPCB Part #=C25900, Manufacturer="UNI-ROYAL(Uniroyal Elec)", Manufacturer Part Number=0402WGF4701TCE, Tolerance=1%, Value2=62.5mW, LCSC Part #=C25900, Manu="UNI-ROYAL(Uniroyal Elec)", MPN=0402WGF4701TCE, Package=0402, Type=Resistor, Value1=4.7K
  R113 R114: Comment Description="RES 4.7K +/-1% 62.5mW 0402"
  R130 R139: Comment Description="RES 100R +/-1% 62.5mW 0402"
R117 R118 R122 R126 R127 R134 R138 R140: library part R0402_4, "RES 0402 GENERIC; VALUE TOLERANCE POWER AND MPN SET ON INSTANCE", Case=0402, JLCPCB Part #=C25117, Manufacturer="UNI-ROYAL(Uniroyal Elec)", Manufacturer Part Number=0402WGF4700TCE, Tolerance=1%, Value2=62.5mW, Comment Description="RES 100R +/-1% 62.5mW 0402", LCSC Part #=C25117, Manu="UNI-ROYAL(Uniroyal Elec)", MPN=0402WGF4700TCE, Package=0402, Type=Resistor, Value1=470R
R119 R120 R121 R123 R124 R125: library part R0402_4, "RES 0402 GENERIC; VALUE TOLERANCE POWER AND MPN SET ON INSTANCE", Case=0603, JLCPCB Part #=C23228, Manufacturer="UNI-ROYAL(Uniroyal Elec)", Manufacturer Part Number=0603WAF6800T5E, Tolerance=1%, Value2=100mW, Comment Description="RES 680R +/-1% 100mW 0603", LCSC Part #=C23228, Manu="UNI-ROYAL(Uniroyal Elec)", MPN=0603WAF6800T5E, Package=0603, Type=Resistor, Value1=680R
R128 R129: library part R0402_4, "RES 0402 GENERIC; VALUE TOLERANCE POWER AND MPN SET ON INSTANCE", Case=0402, JLCPCB Part #=C25900, Manufacturer="UNI-ROYAL(Uniroyal Elec)", Manufacturer Part Number=0402WGF4701TCE, Tolerance=1%, Value1=4.7K, Value2=62.5mW, Comment Description="RES 4.7K +/-1% 62.5mW 0402 - DNP", LCSC Part #=C25900, Manu="UNI-ROYAL(Uniroyal Elec)", MPN=0402WGF4701TCE, Package=0402, Type=Resistor
RS101 RS102 RS103 RS104 RS105 RS106 RS107 RS108: library part R0402_4, "RES 0402 GENERIC; VALUE TOLERANCE POWER AND MPN SET ON INSTANCE", Case=0402, JLCPCB Part #=C25121, Manufacturer="UNI-ROYAL(Uniroyal Elec)", Manufacturer Part Number=0402WGF470KTCE, Tolerance=1%, Value2=62.5mW, Comment Description="RES 4.7R +/-1% 62.5mW 0402", LCSC Part #=C25121, Manu="UNI-ROYAL(Uniroyal Elec)", MPN=0402WGF470KTCE, Package=0402, Type=Resistor, Value1=4.7R
RSH101 RSH102: library part R0402_4, "RES 0402 GENERIC; VALUE TOLERANCE POWER AND MPN SET ON INSTANCE", Case=1206, JLCPCB Part #=C346800, Manufacturer="SEI(Stackpole Elec)", Manufacturer Part Number=CSR1206FT1R00, Tolerance=1%, Value2=500mW, Comment Description="RES 1R +/-1% 62.5mW 0402", LCSC Part #=C346800, Manu="SEI(Stackpole Elec)", MPN=CSR1206FT1R00, Package=1206, Type=Resistor, Value1=1R
SW101 SW102: "SW SMD TACTILE TS-1187A-B-A-B", Case=SMD-4P-5.1x5.1mm, JLCPCB Part #=C318884, Manufacturer="XKB Connection", Value1="SPST Tactile", Value2="50mA, 12V", Availability="Check JLC stock at order", LCSC Part #=C318884, Manu="XKB Connection", Manufacturer Part Number=TS-1187A-B-A-B, MF="XKB Connection", MP=TS-1187A-B-A-B, MPN=TS-1187A-B-A-B, Package=SMD-4P-5.1x5.1mm, Price=None, Type=Switch
U101: "IC SOT-23-5 2A Vin_2.5-5.5V SYNCHRONOUS BUCK CONVERTER TLV62569DBVR", Case=SOT-23-5, JLCPCB Part #=C141836, Value1="Adjustable Buck", Value2="Iout 2A, Vin 2.5-5.5V", Check_prices=https://www.snapeda.com/parts/TLV62569DBVR/Texas+Instruments/view-part/?ref=eda, Manu="Texas Instruments", MF="Texas Instruments", MP=TLV62569DBVR, MPN=TLV62569DBVR, Package=SOT-23-5, SnapEDA_Link=https://www.snapeda.com/parts/TLV62569DBVR/Texas+Instruments/view-part/?ref=snap, Type="DC-DC Converter"
U102: "IC SOT-223 LDO AMS1117-1.8; MANUFACTURER UNVERIFIED", Case=SOT-223, JLCPCB Part #=C6185, Value1="Vout 1.8V", Value2="Iout 1A", Availability="Check JLC stock at order", Manu="Advanced Monolithic Systems", MF="Advanced Monolithic Systems", MP=AMS1117-1.8, MPN=AMS1117-1.8, Package=SOT-223, Price=None, Type=LDO
U103: "IC LQFP-48 48MHz 64KB-FLASH 8KB-SRAM ARM CORTEX-M0 MCU STM32F030C8T6", Case=LQFP-48, JLCPCB Part #=C23922, Manufacturer=STMicroelectronics, Value1="ARM Cortex-M0", Value2="48MHz, Flash 64KB", Check_prices=https://www.snapeda.com/parts/STM32F030C8T6/STMicroelectronics/view-part/?ref=eda, LCSC Part #=C23922, Manu=STMicroelectronics, Manufacturer Part Number=STM32F030C8T6, MF=STMicroelectronics, MP=STM32F030C8T6, MPN=STM32F030C8T6, Package=LQFP-48, SnapEDA_Link=https://www.snapeda.com/parts/STM32F030C8T6/STMicroelectronics/view-part/?ref=snap, Type=MCU
U104: "IC TSSOP-14 GAIN_20V/V QUAD CURRENT-SENSE AMPLIFIER INA4180A1IPWR", Case=TSSOP-14, JLCPCB Part #=C2057528, Manufacturer="Texas Instruments", Value1="Gain 20V/V", Value2="4 channels", Check_prices=https://www.snapeda.com/parts/INA4180A1IPWR/Texas+Instruments/view-part/?ref=eda, LCSC Part #=C2057528, Manu="Texas Instruments", Manufacturer Part Number=INA4180A1IPWR, MF="Texas Instruments", MP=INA4180A1IPWR, MPN=INA4180A1IPWR, Package=TSSOP-14, SnapEDA_Link=https://www.snapeda.com/parts/INA4180A1IPWR/Texas+Instruments/view-part/?ref=snap, Type="Current Sense Amplifier"
U105: "IC SOIC-8 DUAL OPEN-COLLECTOR COMPARATOR LMV393IDR", Case=SOIC-8, JLCPCB Part #=C7984, Manufacturer="Texas Instruments", Value1="Dual Comparator", Value2="Vs 2.7-5.5V", Check_prices=https://www.snapeda.com/parts/LMV393IDR/Texas+Instruments/view-part/?ref=eda, LCSC Part #=C7984, Manu="Texas Instruments", Manufacturer Part Number=LMV393IDR, MF="Texas Instruments", MP=LMV393IDR, MPN=LMV393IDR, Package=SOIC-8, SnapEDA_Link=https://www.snapeda.com/parts/LMV393IDR/Texas+Instruments/view-part/?ref=snap, Type=Comparator

## Free pads (board coordinates)
  round 6 hole 3.3 paste-2539.97: 0(4,66) 0(51,4) 0(51,66) 32(4,4)

## Via types
v1: diameter 0.6, hole 0.3, Top Layer to Bottom Layer, tented both sides, 291 vias

## Nets (pads, with @x,y where several pads share a name; then routed paths per layer and width w, separated by ;. In a path a pad name is that pad's centre, name@x,y a point inside that pad or via, vN(x,y) a via of type N, cw(c..) or ccw(c..) an arc to the next point about the centre after c; other vN are vias at no path point)
1V8_LOOP_LED: LED104.2 U103.41 | length 8.9
  Top Layer w0.254: U103.41@27.975,46.13 27.975,48.225 28.975,49.225 v1(28.975,49.85) ; v1(30.975,52.3) 31.025,52.35 LED104.2@32.1,52.35
  Bottom Layer w0.254: v1(28.975,49.85) 28.975,50.9 30.375,52.3 v1(30.975,52.3)
3V3: 101.1 C101.1 C102.1 C106.1 C107.1 C108.1 C109.1 C114.1 C115.1 C116.1 C117.1 C118.1 C126.1 C127.1 C131.1 H101.1 L101.2 R101.1 R107.1 R119.1 R120.1 R121.1 R123.1 R124.1 R125.1 R130.1 R131.1 R132.1 R133.1 R139.1 U102.3 U103.1 U103.9 U103.24 U103.48 U104.4 U105.8 | length 251.3
  Top Layer w0.3: C117.1@20.5,40.4 20.8,40.7 U103.9@23.045,40.7 ; C116.1@21.5,44.575 21.625,44.7 U103.1@23.045,44.7 ; C114.1@23.95,47.725 24.475,47.2 U103.48@24.475,46.13 ; U103.24@29.975,37.77 30.855,37.77 31.875,36.75 C115.1@31.875,36.15
  Top Layer w0.4: C127.1@20.975,14.7 21.875,14.7 22.35,15.175 U104.4@24.205,15.175
  Top Layer w0.5: v1(8.275,36.25) 8.388,36.137 R132.1@8.388,35.2 ; R131.1@8.3,47.975 v1(8.3,48.95) ; v1(17.725,40.2) 17.9,40.025 C118.1@19.025,40.025 20.125,40.025 C117.1@20.5,40.4 ; v1(18.2,62.375) 101.1@18.2,68.85 ; v1(18.825,14.575) C126.1@19.85,14.575 C127.1@20.975,14.575 ; 18.9,62.8 18.9,65.275 21.475,67.85 R101.1@26.425,67.85 C102.1@26.425,66.725 ; R107.1@19.65,43.632 v1@19.65,44.25 ; v1(20.8,44.575) C116.1@21.5,44.575 ; v1(23.05,47.725) C114.1@23.95,47.725 ; v1(28.525,27.9) C131.1@29.425,27.9 29.425,26.675 U105.8@29.595,26.505 ; C115.1@31.875,36.15 33.175,36.15 v1(33.225,36.2) ; R130.1@33.975,33.75 v1(33.975,34.398) 34.027,34.45 38.35,34.45 38.7,34.1 R139.1@38.7,33.75 v1(42.525,33.75) ; v1(47.175,27.425) 47.175,26.6 R133.1@47.2,26.575
  Top Layer w0.8: R119.1@10.55,55.15 10.7,55 v1(11.575,55) v1@12.7,55 ; v1(12.7,55.025) v1@13.8,55.025 ; v1(13.825,55) 15.25,55 15.275,55.025 48.775,55.025 51.2,52.6 51.2,50.265 H101.1@51.35,50.115
  Top Layer w1.5: 3.275,17.15 3.275,15.775 4.325,14.725 15.175,14.725
  Bottom Layer w0.5: 6.762,51.987 8.275,50.475 8.275,36.3 v1@8.325,36.25 ; v1(42.525,33.75) 43.8,33.75 47.175,30.375 v1(47.175,27.425)
  Bottom Layer w1.5: 3.25,15.925 3.3,15.975 3.3,48.525 6.762,51.987 9.775,55 v1(11.575,55) 13.25,55 13.275,54.975 ; v1(13.825,55) 13.825,55.6 16.785,58.56 16.785,61.76 ; 14.425,14.725 18.825,14.725 v1@18.85,14.7 ; v1@17.9,40.375 17.9,42.875 19.275,44.25 20.475,44.25 v1(20.8,44.575) 23.05,46.825 v1(23.05,47.725) ; v1(19.075,61.6) 18.704,61.168 18.937,58.147 23.05,53.898 v1(23.05,47.725) ; v1(28.525,27.9) 29.175,28.55 29.175,33.65 31.725,36.2 v1(33.225,36.2) ; v1(33.975,34.398) 33.975,35.45 v1(33.225,36.2) ; v1(23.05,47.725) 23.975,47.725 33.225,38.475 v1(33.225,36.2)
  other v1: 14.591,14.286 15.541,14.286 14.591,15.136 15.541,15.136 2.8,16.5 3.75,16.5 2.8,17.35 3.75,17.35 19.65,44.25 6.6,51.4 6.1,51.975 7.45,52.2 6.9,52.725 18.2,61.6 19.075,62.375
FAIL_LED: LED106.2 U103.40 | length 15.8
  Top Layer w0.254: U103.40@28.475,46.13 28.475,47.25 29.802,48.577 35.819,48.577 v1(36.55,48.577) ; v1(38.325,52.275) 39.532,52.275 LED106.2@39.607,52.35
  Bottom Layer w0.254: v1(36.55,48.577) 36.616,48.643 37.218,48.643 37.9,49.325 37.9,51.85 v1(38.325,52.275)